# Altium PCB Acoustics.PcbDoc (part 2 of 2)
Units mil, origin at the board's own origin, x right, y up, seen from the top; angles counter-clockwise.
Board outline 6000 x 4000 mil, 4 copper layers (Top Layer, Middle 1, Middle 2, Bottom Layer), stack 23.712 mil thick; 129 components, 90 nets, 526 pads, 20 vias.
Unrouted connection lines stored in the file: 224.
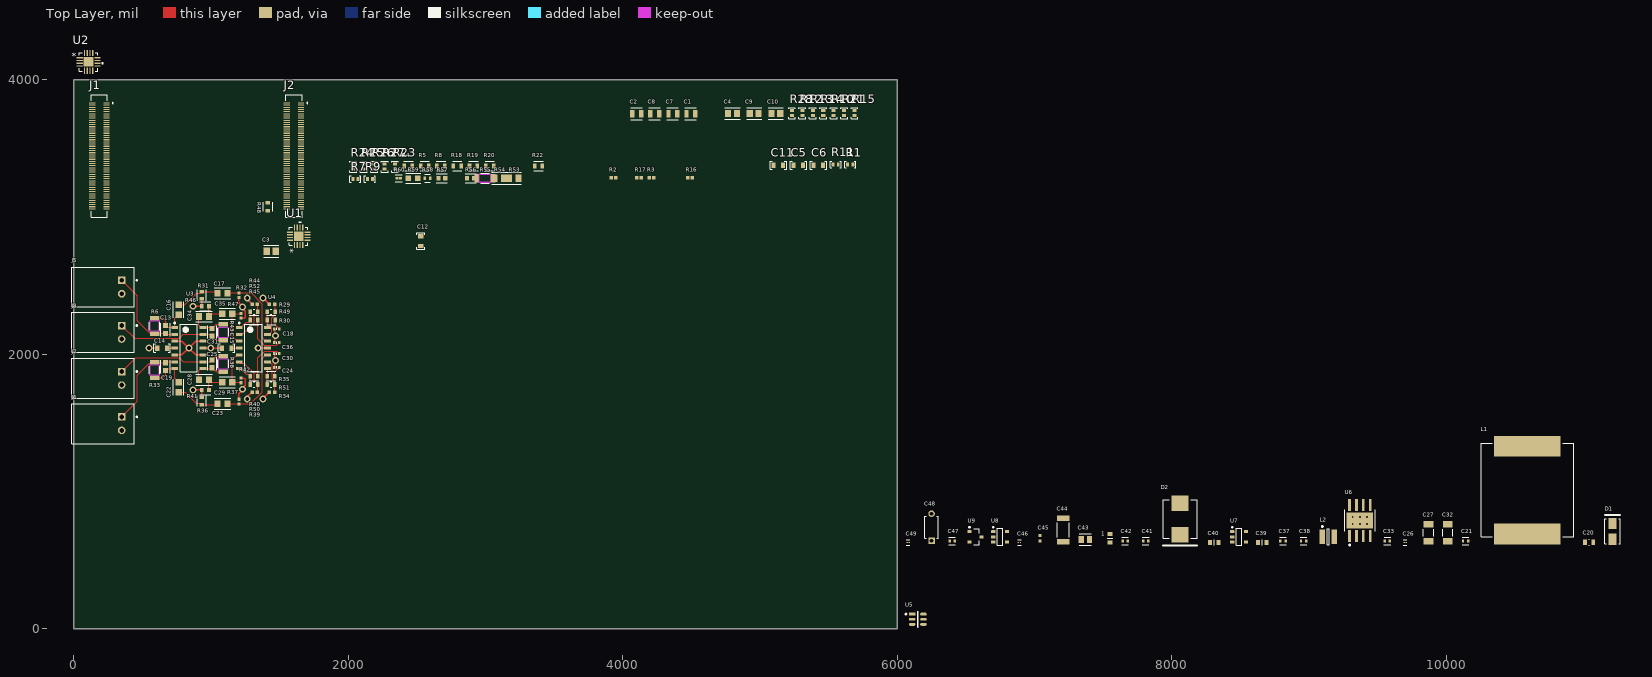
[diagram p0: Top Layer view]

## Via types
v1: diameter 50, hole 28, Top Layer to Bottom Layer, 14 vias
v2: diameter 24.8, hole 12.99, Top Layer to Bottom Layer, 6 vias

## Nets (pads, with @x,y where several pads share a name; then routed paths per layer and width w, separated by ;. In a path a pad name is that pad's centre, name@x,y a point inside that pad or via, vN(x,y) a via of type N, cw(c..) or ccw(c..) an arc to the next point about the centre after c; other vN are vias at no path point) (continued)
NetC3_2: C3.2 R48.1 U1.15
NetC4_1: C4.1 R5.2 U1.5
NetC4_2: C4.2 R8.2 U1.6
NetC7_2: C7.2 R16.2
NetC8_2: C8.2 R17.2
NetC9_1: C9.1 R18.1 U2.16
NetC9_2: C9.2 R20.1 U2.15
NetC10_1: C10.1 R19.2 U2.5
NetC10_2: C10.2 R22.2 U2.6
NetC13_1: C13.1 J5.1 R6.1 U3.2 | length 658.3
  Top Layer w3.54: J5.1 464.06,2425.98 464.06,2244.3 551.5,2156.85 581.15,2156.85 R6.1 593.39,2151.39 C13.1 676.39,2145 U3.2
NetC13_2: C13.2 C16.1 R6.2 U3.1 | length 298.7
  Top Layer w3.54: R6.2 648,2262 670,2240 C13.2 683.61,2195 U3.1 736.65,2261.22 763.95,2288.52 C16.1
NetC16_2: C16.2 C17.1 R31.2 | length 327.8
  Top Layer w3.54: C16.2 811.96,2361.48 895.92,2445.45 923.8,2445.45 R31.2 1036.87,2456.64 C17.1
NetC17_2: C17.2 R32.2 U4.12 | length 582
  Top Layer w3.54: C17.2 1123.22,2446.73 R32.2 1293.12,2446.73 1375,2364.85 1375,2119.57 1399.57,2095 U4.12
NetC18_2: C18.2 R30.2 R48.2 | length 77.1
  Top Layer w3.54: R30.2 1468.54,2215.16 1497.72,2185.98 C18.2
NetC19_1: C19.1 J6.1 R33.1 U3.6 | length 664.9
  Top Layer w3.54: J6.1 464.06,1657.45 464.06,1845.7 551.5,1933.15 581.15,1933.15 R33.1 593.39,1938.61 C19.1 676.39,1945 U3.6
NetC19_2: C19.2 C22.1 R33.2 U3.7 | length 303.7
  Top Layer w3.54: R33.2 648,1828 670,1850 C19.2 683.61,1895 U3.7 736.65,1824.83 742.91,1818.57 742.91,1817.52 763.95,1796.48 C22.1
NetC20_1: C20.1 U5.1
NetC20_2: C20.2 L1.1 U5.6
NetC22_2: C22.2 C23.1 R36.2 | length 321.5
  Top Layer w3.54: C22.2 814.46,1723.52 893.42,1644.55 923.8,1644.55 R36.2 1046.87,1633.36 C23.1@1048.52,1635
NetC23_2: C23.2 R37.2 U4.10 | length 584
  Top Layer w3.54: C23.2 1123.22,1638.27 1288.12,1638.27 1375,1725.15 1375,1970.43 1399.57,1995 U4.10
NetC24_2: C24.2 R8.1 R35.2 | length 77.7
  Top Layer w3.54: R35.2 1467.09,1873.39 1497.72,1904.02 C24.2
NetC25_1: C25.1 J7.1 R38.1 U3.9 | length 811.3
  Top Layer w3.54: J7.1 451.61,1975 770,1975 800,1945 U3.9 996.39,1945 C25.1 1010,1959.53 1026.18,1975.71 1027.1,1975.71 1038.39,1987 R38.1
NetC25_2: C25.2 C28.1 R38.2 U3.8 | length 250.8
  Top Layer w3.54: C28.1 913.52,1878.95 929.57,1895 U3.8 C25.2@1001.39,1895 ; C25.2 1010,1900.47 1026.18,1884.29 1027.1,1884.29 1038.39,1873 R38.2
NetC28_2: C28.2 C29.1 R41.2 | length 180.4
  Top Layer w3.54: R41.2 986.48,1740.16 C28.2 1006.48,1795 C29.1
NetC29_2: C29.2 R42.2 U4.5 | length 298.1
  Top Layer w3.54: U4.5 1192.87,1995 1156.48,1958.61 C29.2 1223.27,1795 R42.2@1225,1793.27
NetC30_2: C30.2 R22.1 R40.2 | length 315.7
  Top Layer w3.54: R40.2 1343.54,1973.54 1392.6,2022.6 1480.12,2022.6 1489.09,2013.63 1489.7,2013.63 1497.72,2005.61 C30.2
NetC31_1: C31.1 J8.1 R43.1 U3.13 | length 808.6
  Top Layer w3.54: J8.1 445.04,2115 770,2115 800,2145 U3.13 996.39,2145 C31.1 1010,2130.47 1026.18,2114.29 1027.1,2114.29 1038.39,2103 R43.1
NetC31_2: C31.2 C34.1 R43.2 U3.14 | length 261.1
  Top Layer w3.54: C34.1 913.52,2211.05 929.57,2195 U3.14 1003.61,2195 C31.2 ; C31.2@1010,2189.53 1026.18,2205.71 1027.1,2205.71 1038.39,2217 R43.2
NetC33_1: C33.1 U6.1
NetC33_2: C33.2 D2.1 L2.1 U6.8
NetC34_2: C34.2 C35.1 R46.2 | length 180.4
  Top Layer w3.54: R46.2 986.48,2349.84 C34.2 1006.48,2295 C35.1
NetC35_2: C35.2 R47.2 U4.3 | length 293.1
  Top Layer w3.54: U4.3 1192.87,2095 1156.48,2131.39 C35.2 1218.27,2295 R47.2
NetC36_2: C36.2 R20.2 R45.2 | length 320.6
  Top Layer w3.54: R45.2 1343.54,2111.46 1390,2065 1477.72,2065 1489.09,2076.37 1489.7,2076.37 1497.72,2084.39 C36.2
NetC43_1: C43.1 U7.4
NetC44_2: C44.2 R57.2 U6.6
NetC45_2: C45.2 R57.1
NetC48_1: C48.1 U8.3 U9.2
NetJ2_30: J2.30 R12.1
NetJ2_35: J2.35 R9.1
NetJ2_36: J2.36 R7.1
NetJ2_37: J2.37 R24.2
NetJ2_39: J2.39 R10.2
NetJ2_54: J2.54 R26.1
NetJ2_56: J2.56 R23.1
NetJ2_58: J2.58 R21.1
NetJ2_78: J2.78 J2.84
NetR1_2: R1.2 R2.1 R3.1 U1.1 U1.4
NetR4_2: R4.2 R14.1
NetR5_1: R5.1 R13.1
NetR7_2: R7.2 U1.12
NetR9_2: R9.2 U1.11
NetR10_1: R10.1 U1.8
NetR11_2: R11.2 U1.10
NetR12_2: R12.2 U1.9
NetR15_2: R15.2 R16.1 R17.1 U2.1 U2.4
NetR18_2: R18.2 R28.1
NetR19_1: R19.1 R27.1
NetR21_2: R21.2 U2.12
NetR23_2: R23.2 U2.11
NetR24_1: R24.1 U2.8
NetR25_2: R25.2 U2.10
NetR26_2: R26.2 U2.9
NetR29_1: R29.1 R49.1 U4.13 | length 252.1
  Top Layer w3.54: U4.13 1427.13,2145 1445.67,2163.54 1445.67,2267.21 1467.5,2289.04 1467.5,2309.45 R49.1 1468.05,2361.63 R29.1
NetR30_1: R30.1 R49.2 U4.14 | length 116
  Top Layer w3.54: R49.2 1411.95,2250.49 R30.1 1413.35,2248.11 U4.14
NetR34_1: R34.1 R51.1 U4.9 | length 250.5
  Top Layer w3.54: U4.9 1427.13,1945 1445.91,1926.22 1445.91,1821.09 1455.74,1811.26 1455.8,1811.26 1466.1,1800.96 R51.1 1466.1,1726.42 R34.1
NetR35_1: R35.1 R51.2 U4.8 | length 116.4
  Top Layer w3.54: R51.2 R35.1 1413.35,1843.35 U4.8
NetR39_1: R39.1 R50.1 U4.6 | length 287.1
  Top Layer w3.54: U4.6 1215.6,1936.05 1238.95,1936.05 1315,1860 1315,1813.46 1343.05,1785.41 R50.1 R39.1@1343.05,1728.05
NetR40_1: R40.1 R50.2 U4.7 | length 165.7
  Top Layer w3.54: U4.7 1220.43,1895 1259.49,1855.94 1275.43,1855.94 1286.46,1844.92 R40.1 1286.95,1839.51 R50.2
NetR44_1: R44.1 R52.1 U4.2 | length 291.6
  Top Layer w3.54: U4.2 1214.84,2153.19 1238.19,2153.19 1315,2230 1315,2276.54 1343.05,2304.59 R52.1 1343.05,2361.63 R44.1
NetR45_1: R45.1 R52.2 U4.1 | length 165.7
  Top Layer w3.54: U4.1 1220.43,2195 1259.49,2234.06 1275.43,2234.06 1286.46,2245.08 R45.1 1286.95,2250.49 R52.2
NetR53_1: R53.1 U5.4
NetR54_1: R54.1 R55.2 U5.3
NetR56_1: R56.1 R59.2 U6.5
NetR58_2: R58.2 U6.4
NetR60_1: R60.1 U8.1 U8.4
VBUS: 
VIN_PROT: C21.1 C26.1 C37.1 C38.1 D1.2 R53.2 U5.5 U6.2
pads on no net: J1.1 J1.2 J1.3 J1.4 J1.5 J1.6 J1.9 J1.10 J1.11 J1.12 J1.15 J1.16 J1.17 J1.18 J1.21 J1.22 J1.23 J1.24 J1.27 J1.28 J1.29 J1.30 J1.33 J1.34 J1.35 J1.36 J1.39 J1.40 J1.41 J1.42 J1.43 J1.45 J1.46 J1.47 J1.48 J1.49 J1.51 J1.52 J1.53 J1.54 J1.57 J1.58 J1.59 J1.60 J1.63 J1.64 J1.65 J1.66 J1.69 J1.70 J1.71 J1.72 J1.75 J1.76 J1.77 J1.78 J1.81 J1.82 J1.83 J1.84 J1.87 J1.88 J1.89 J1.90 J1.93 J1.94 J1.95 J1.96 J1.99 J1.100 J2.3 J2.4 J2.5 J2.6 J2.9 J2.10 J2.11 J2.12 J2.15 J2.16 J2.17 J2.18 J2.19 J2.20 J2.21 J2.24 J2.25 J2.26 J2.27 J2.28 J2.29 J2.31 J2.38 J2.40 J2.41 J2.44 J2.45 J2.46 J2.47 J2.48 J2.49 J2.50 J2.51 J2.55 J2.57 J2.61 J2.62 J2.63 J2.64 J2.67 J2.68 J2.69 J2.70 J2.72 J2.73 J2.75 J2.76 J2.80 J2.82 J2.86 J2.88 J2.89 J2.90 J2.91 J2.92 J2.93 J2.94 J2.95 J2.96 J2.97 J2.99 J2.100 U6.3 U8.2

## Polygon pours and split planes (outlines as drawn)
GND on Middle 1 (split plane): 5979.9,20.1 20.1,20.1 20.1,3979.9 5979.9,3979.9
GND on Middle 2 (split plane): 5979.9,20.1 20.1,20.1 20.1,3979.9 5979.9,3979.9

## Text inside footprints (layer, text, board x,y; h text height)
U1: Top 3D Body "*" at 1625.63,2806.16 h50 r90; Top Overlay "*" at 1625.63,2735.7 h50 r90
U2: Top 3D Body "*" at 55.96,4144.17 h50; Top Overlay "*" at -14.5,4144.17 h50